# Altium PCB Expansion_Board_LDO Ver_for_MSP430.PcbDoc (part 2 of 2)
Units mil, origin at the board's own origin, x right, y up, seen from the top; angles counter-clockwise.
Board outline 6000 x 4000 mil, 2 copper layers (Top Layer, Bottom Layer); 157 components, 146 nets, 583 pads, 420 vias.
Unrouted connection lines stored in the file: 1.
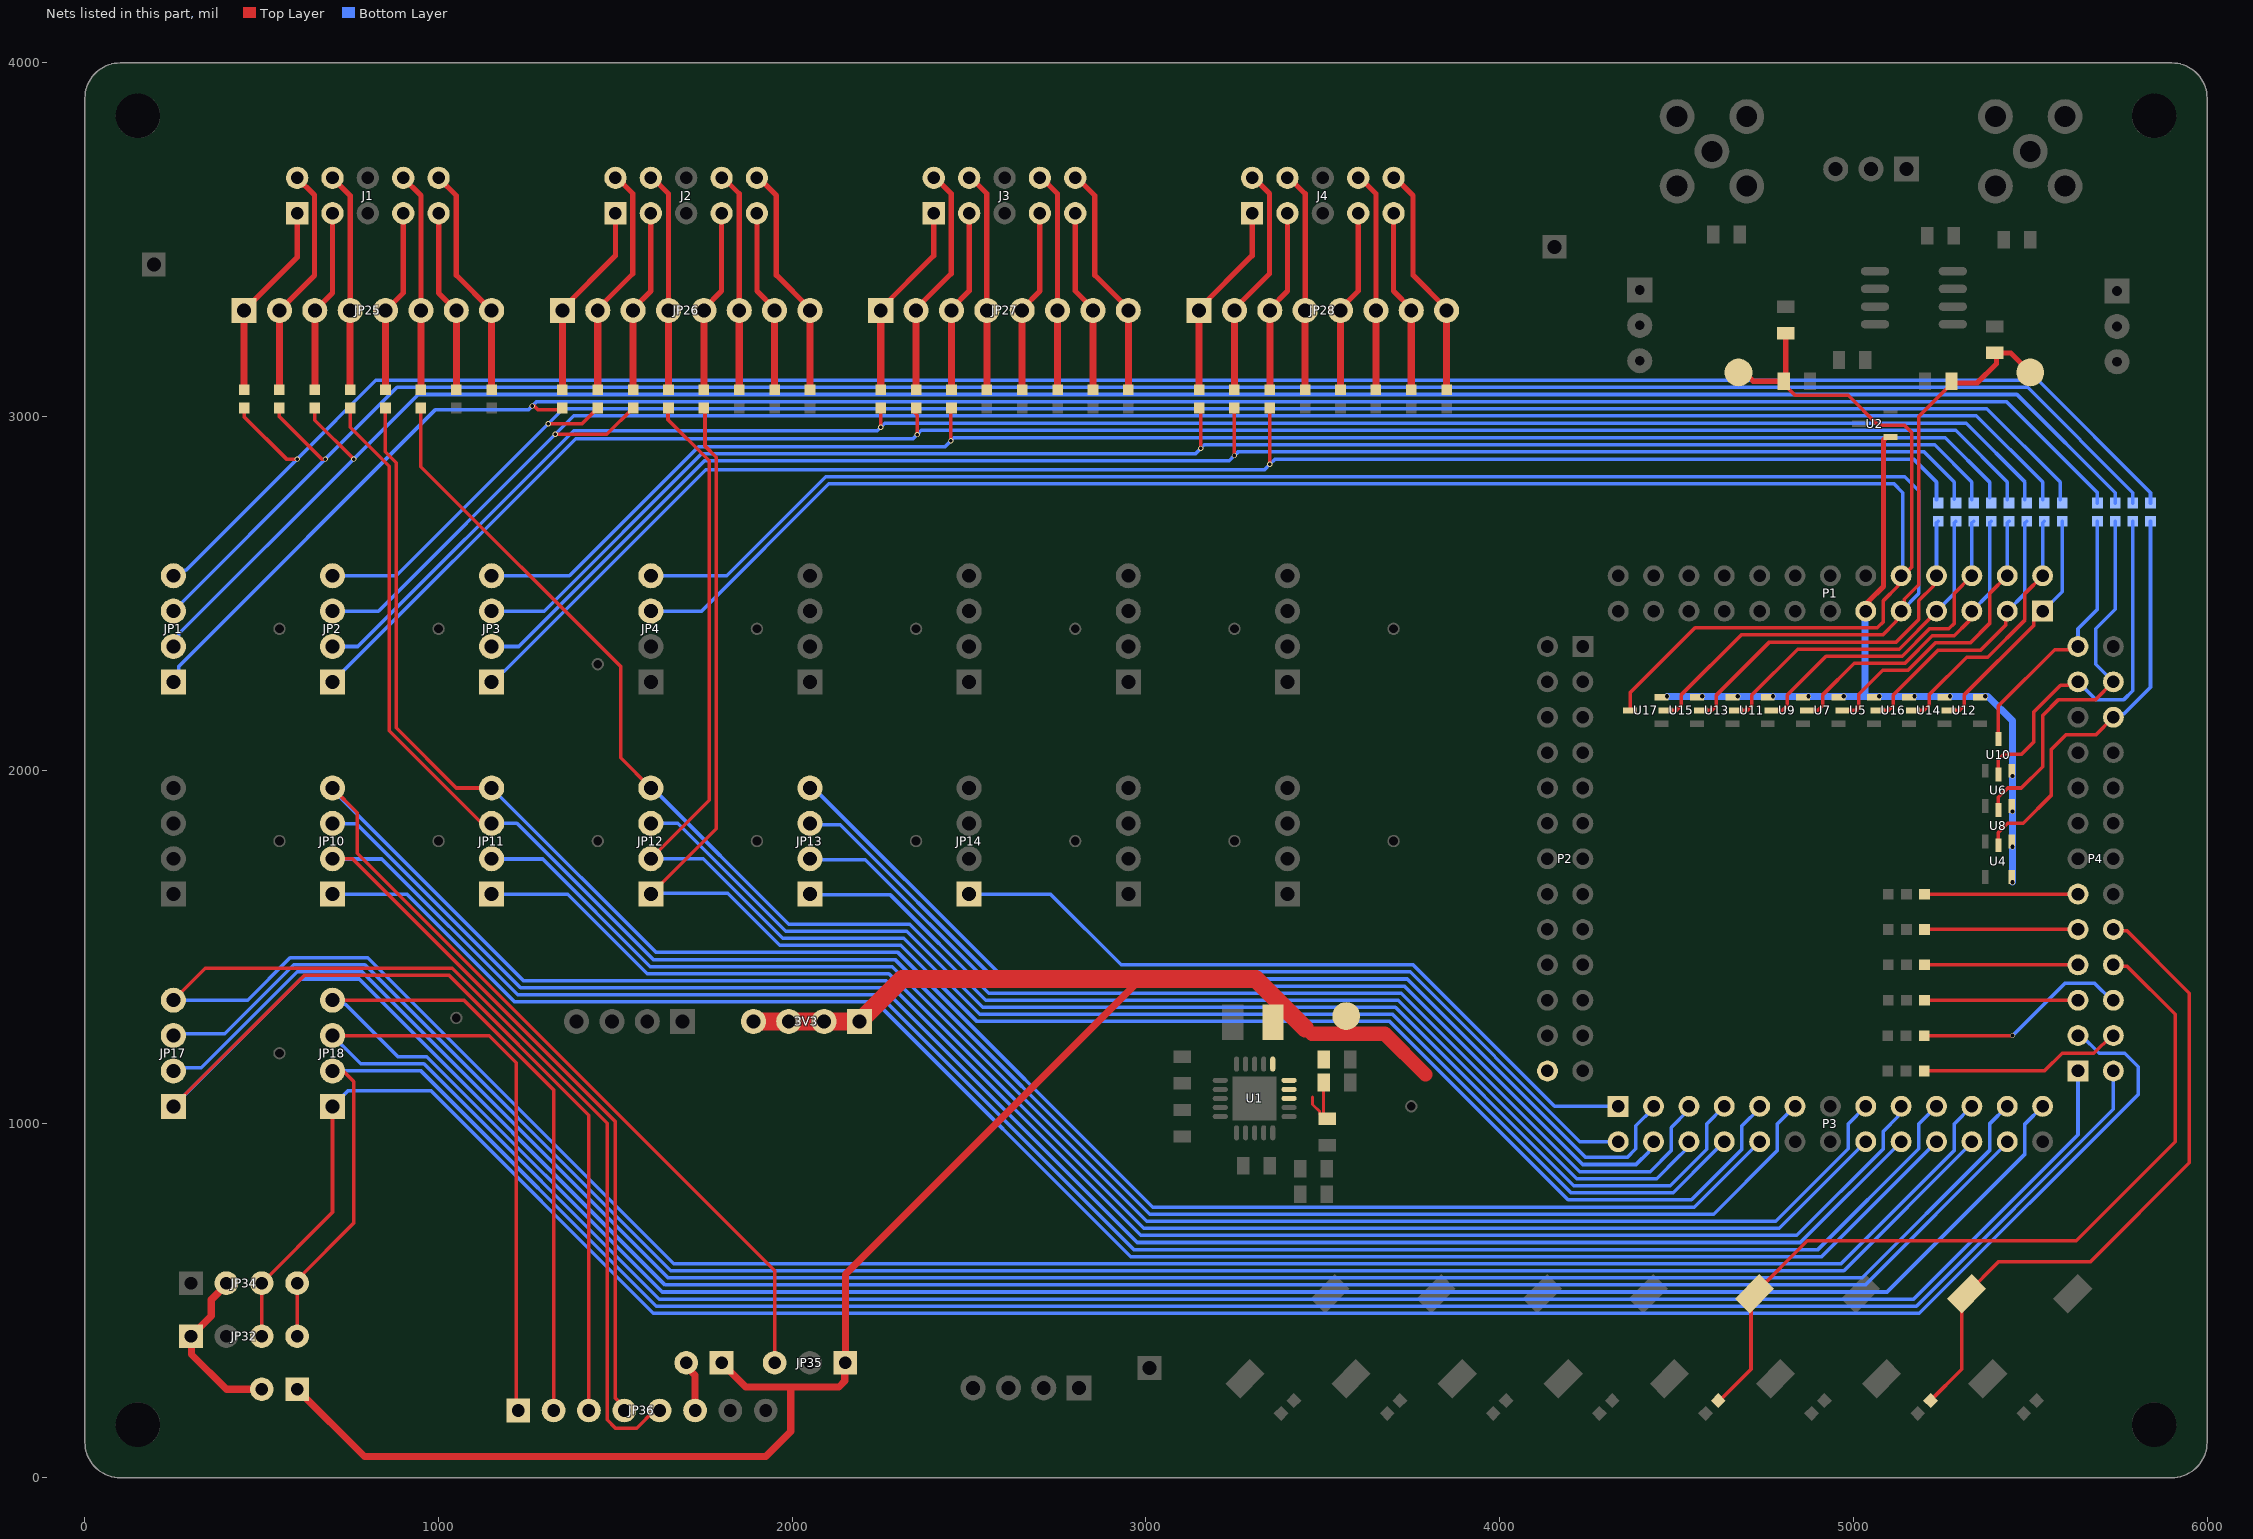
[diagram p2: the nets of this part, all layers, seen from the top]

## Via types
v1: diameter 15, hole 10, Top Layer to Bottom Layer, tented both sides, 265 vias
v2: diameter 15, hole 12, Top Layer to Bottom Layer, tented both sides, 155 vias

## Nets (pads, with @x,y where several pads share a name; then routed paths per layer and width w, separated by ;. In a path a pad name is that pad's centre, name@x,y a point inside that pad or via, vN(x,y) a via of type N, cw(c..) or ccw(c..) an arc to the next point about the centre after c; other vN are vias at no path point) (continued)
P5.0: 5.0.1 JP4.4 P1.9 R38.1 R39.2 U15.3 | length 5895.8
  Top Layer w10: U15.3@4468.48,2169.14 4498.99,2169.14 4512.77,2182.92 4512.77,2212.77 4682.65,2382.65 5082.65,2382.65 5121.01,2421.01 5121.01,2422.74 5135,2436.73 P1.9@5135,2450 5143.99,2458.99 5143.99,2483.99 5185,2525 5185,3000.1 R39.2@5277.4,3092.5
  Top Layer w15: R39.2@5277.4,3100 5282.4,3095 5350,3095 5404.51,3149.51 5404.51,3175.49 R38.1@5400,3180 5445,3180 5.0.1@5500,3125
  Bottom Layer w10: JP4.4@1600,2550 1815,2550 2095,2830 5145,2830 5185,2790 5185,2500 P1.9@5135,2450
P5.1: 5.1.1 JP4.3 P1.10 R34.1 R35.2 U17.3 | length 6060.8
  Top Layer w10: U17.3@4368.48,2169.14 4368.48,2218.81 4552.31,2402.65 5067.65,2402.65 5085,2420 5085,2480 5125.61,2520.61 5125.61,2540.61 P1.10@5135,2550 5140.31,2550 5165,2574.69 5165,2955 5145,2975 5070.47,2975 4985.46,3060 4835.1,3060 4815.1,3080 4802.6,3092.5 R35.2@4802.6,3100 R35.2@4809.07,3106.47
  Top Layer w15: 5.1.1@4675,3125 4692.25,3125 4717.24,3100 R35.2@4802.6,3100 ; R35.2@4809.07,3106.47 R34.1@4809.07,3235.97
  Bottom Layer w10: JP4.3@1600,2450 1743.28,2450 2103.28,2810 5115,2810 5140,2785 5140,2555 P1.10@5135,2550
P5.4: JP14.1 P3.1 | length 2083.5
  Bottom Layer w10: JP14.1@2500,1650 2730,1650 2930,1450 3755,1450 4155,1050 P3.1@4335,1050
P5.5: JP13.4 P3.2 | length 2699.2
  Bottom Layer w10: JP13.4@2050,1950 2060,1950 2580,1430 3746.72,1430 4226.72,950 P3.2@4335,950
P5.6: JP13.3 P3.3 | length 2877.1
  Bottom Layer w10: JP13.3@2050,1850 2054.27,1845.73 2135.99,1845.73 2571.72,1410 3738.43,1410 4242.96,905.47 4360.47,905.47 4385,930 4385,995 4435,1045 P3.3@4435,1050
P5.7: JP13.2 P3.4 | length 2778.6
  Bottom Layer w10: JP13.2@2050,1750 2053.28,1746.72 2206.72,1746.72 2563.43,1390 3730.15,1390 4234.68,885.47 4385.47,885.47 4421.01,921.01 4421.01,922.74 4435,936.73 P3.4@4435,950
P6.0: JP1.4 R1.1 R49.2 | length 6204.4
  Top Layer w10: R1.1@450,3024.41 450,3000 570,2880 v1(600.47,2880)
  Bottom Layer w10: JP1.4@250,2550 266.47,2550 282.13,2565.66 285.66,2565.66 600.23,2880.23 822.5,3102.5 5522.5,3102.5 5840,2785 R49.2@5840,2755.59
P6.0-: P4.22 R49.1 U4.3 | length 1181.8
  Top Layer w10: U4.3@5410,1788.07 5410,1824.09 5435.91,1850 5480,1850 5560,1930 5560,2060 5600,2100 5685,2100 P4.22@5735,2150
  Bottom Layer w10: P4.22@5735,2150 5744.39,2159.39 5764.39,2159.39 5840,2235 R49.1@5840,2704.41
P6.1: JP1.3 R5.1 R50.2 | length 6158.7
  Top Layer w10: R5.1@550,3024.41 550,3000 670,2880 v1(680,2880)
  Bottom Layer w10: JP1.3@250,2450 v1(680,2880) 882.5,3082.5 5492.5,3082.5 5790,2785 R50.2@5790,2755.59
P6.1-: P4.23 R50.1 U6.3 | length 1073.3
  Top Layer w10: U6.3@5410,1988.07 5410,2030 5424.87,2044.87 5474.87,2044.87 5510,2080 5510,2165 5585.61,2240.61 5625.61,2240.61 P4.23@5635,2250
  Bottom Layer w10: P4.23@5635,2250 5685,2200 5765,2200 5790,2225 R50.1@5790,2704.41
P6.2: JP1.2 R9.1 R51.2 | length 6131.2
  Top Layer w10: R9.1@650,3024.41 650,2990 v1(760,2880)
  Bottom Layer w10: JP1.2@250,2350 250,2366.47 265.66,2382.13 265.66,2385.66 v1(760,2880) 942.5,3062.5 5462.5,3062.5 5740,2785 R51.2@5740,2755.59
P6.2-: P4.24 R51.1 U8.3 | length 1078.9
  Top Layer w10: U8.3@5410,1888.07 5410,1924.09 5435.91,1950 5475,1950 5535,2010 5535,2155 5580,2200 5685,2200 P4.24@5735,2250
  Bottom Layer w10: P4.24@5735,2250 5685,2300 5685,2400 5740,2455 R51.1@5740,2704.41
P6.3: JP1.1 R2.1 R52.2 | length 6012.1
  Top Layer w10: v1(1265,3030) 1270,3030 1280,3020 1345.6,3020 R2.1@1350,3024.41
  Bottom Layer w10: JP1.1@250,2250 265.9,2265.9 265.9,2294.58 991.32,3020 1255,3020 v1(1265,3030) 1277.5,3042.5 5432.5,3042.5 5690,2785 R52.2@5690,2755.59
P6.3-: P4.25 R52.1 U10.3 | length 765.5
  Top Layer w10: U10.3@5410,2088.07 5410,2181.72 5568.9,2340.61 5625.61,2340.61 P4.25@5635,2350
  Bottom Layer w10: P4.25@5635,2350 5635,2400 5690,2455 R52.1@5690,2704.41
P6.4: JP2.4 R6.1 R41.1 | length 5375.1
  Top Layer w10: v1(1310,2980) 1405.6,2980 R6.1@1450,3024.41
  Bottom Layer w10: JP2.4@700,2550 880,2550 v1(1310,2980) 1352.5,3022.5 5377.5,3022.5 5585,2815 R41.1@5585,2765
P6.4-: P1.1 R41.2 U12.3 | length 686.3
  Top Layer w10: U12.3@5268.48,2169.14 5298.99,2169.14 5312.77,2182.92 5312.77,2212.77 5510.47,2410.47 5510.47,2425.47 P1.1@5535,2450
  Bottom Layer w10: P1.1@5535,2450 5590,2505 R41.2@5590,2704.41
P6.5: JP2.3 R10.1 R42.2 | length 5442.3
  Top Layer w10: v1(1330,2950) 1475.6,2950 R10.1@1550,3024.41
  Bottom Layer w10: JP2.3@700,2450 830,2450 v1(1330,2950) 1382.5,3002.5 5347.5,3002.5 5535,2815 R42.2@5535,2765
P6.5-: P1.2 R42.1 U14.3 | length 742.2
  Top Layer w10: U14.3@5168.48,2169.14 5198.99,2169.14 5215,2185.15 5215,2215 5320,2320 5380,2320 5485,2425 5485,2500 P1.2@5535,2550
  Bottom Layer w10: P1.2@5535,2550 5535,2699.41 R42.1@5540,2704.41
P6.6: JP2.2 R3.1 R43.1 | length 5219.5
  Top Layer w10: v1(2250,2970) R3.1@2250,3024.41
  Bottom Layer w10: JP2.2@700,2350 771.72,2350 1381.72,2960 2240,2960 v1(2250,2970) 2260.96,2980.96 5319.04,2980.96 5485,2815 R43.1@5485,2765
P6.6-: P1.3 R43.2 U16.3 | length 798
  Top Layer w10: U16.3@5068.48,2169.14 5098.99,2169.14 5112.77,2182.92 5112.77,2212.77 5160,2260 5240,2340 5360,2340 5431.33,2411.33 5431.33,2446.33 P1.3@5435,2450
  Bottom Layer w10: P1.3@5435,2450 5485,2500 5485,2699.41 R43.2@5490,2704.41
P6.7: JP2.1 R7.1 R44.2 | length 5223.6
  Top Layer w10: R7.1@2350,3024.41 2341.25,3015.66 2352.98,3003.93 v1(2352.98,2949.23)
  Bottom Layer w10: JP2.1@700,2250 1387.5,2937.5 2341.25,2937.5 v1(2352.98,2949.23) 2364.71,2960.96 5289.04,2960.96 5435,2815 R44.2@5435,2765
P6.7-: P1.4 R44.1 U5.3 | length 854
  Top Layer w10: U5.3@4968.48,2169.14 5009.14,2169.14 5015,2175 5015,2215 5082.65,2282.65 5154.36,2282.65 5231.72,2360 5330,2360 5385,2415 5385,2500 P1.4@5435,2550
  Bottom Layer w10: P1.4@5435,2550 5435,2699.41 R44.1@5440,2704.41
P7.2: JP13.1 P3.5 | length 2930.3
  Bottom Layer w10: JP13.1@2050,1650 2052.43,1647.57 2277.57,1647.57 2555.15,1370 3721.86,1370 4226.39,865.47 4425.47,865.47 4485,925 4485,990 4535,1040 P3.5@4535,1050
P7.3: JP12.4 P3.6 R21.1 | length 4787.2
  Top Layer w10: R21.1@950,3024.41 950,2858.43 1515,2293.43 1515,2035 JP12.4@1600,1950
  Bottom Layer w10: JP12.4@1600,1950 1604.85,1950 1989.85,1565 2331.86,1565 2546.86,1350 3713.58,1350 4218.11,845.47 4443.76,845.47 4505,906.72 4520.16,921.87 ; 4520.16,921.88 4535,936.73 P3.6@4535,950
P7.4: JP3.4 R11.1 R45.1 | length 4588.6
  Top Layer w10: v1(2448.58,2931.65) 2448.58,3018.36 2452.31,3022.09 R11.1@2450,3024.41
  Bottom Layer w10: JP3.4@1150,2550 1370,2550 1735,2915 2431.93,2915 v1(2448.58,2931.65) 2456.93,2940 5260,2940 5385,2815 R45.1@5385,2770
P7.4-: P1.5 R45.2 U7.3 | length 889.3
  Top Layer w10: U7.3@4868.48,2169.14 4898.99,2169.14 4912.77,2182.92 4912.77,2212.77 5002.65,2302.65 5146.08,2302.65 5223.43,2380 5285,2380 5325.61,2420.61 5325.61,2440.61 P1.5@5335,2450
  Bottom Layer w10: P1.5@5335,2450 5385,2500 5385,2699.41 R45.2@5390,2704.41
P7.5: JP3.3 R4.1 R46.2 | length 4589.6
  Top Layer w10: R4.1@3150,3024.41 3155,3019.41 v1(3155,2910)
  Bottom Layer w10: JP3.3@1150,2450 1298.28,2450 1743.28,2895 3140,2895 v1(3155,2910) 3165,2920 5230,2920 5335,2815 R46.2@5335,2765
P7.5-: P1.6 R46.1 U9.3 | length 948
  Top Layer w10: U9.3@4768.48,2169.14 4798.99,2169.14 4812.77,2182.92 4812.77,2212.77 4922.65,2322.65 5137.79,2322.65 5215.15,2400 5270,2400 5285,2415 5285,2500 P1.6@5335,2550
  Bottom Layer w10: P1.6@5335,2550 5335,2699.41 R46.1@5340,2704.41
P7.6: JP3.2 R8.1 R47.1 | length 4591.2
  Top Layer w10: 3250,2900 v1(3250,2890) R8.1@3250,3024.41
  Bottom Layer w10: JP3.2@1150,2350 1226.57,2350 1751.57,2875 3235,2875 v1(3250,2890) 3260,2900 5200,2900 5285,2815 R47.1@5285,2766.26
P7.6-: P1.7 R47.2 U11.3 | length 978.6
  Top Layer w10: U11.3@4668.48,2169.14 4698.99,2169.14 4712.77,2182.92 4712.77,2212.77 4842.65,2342.65 5129.51,2342.65 5235,2448.14 P1.7@5235,2450
  Bottom Layer w10: P1.7@5235,2450 5285,2500 5285,2699.41 R47.2@5290,2704.41
P7.7: JP3.1 R12.1 R48.2 | length 4582.3
  Top Layer w10: v1(3350,2865) R12.1@3350,3024.41
  Bottom Layer w10: JP3.1@1150,2250 1180.43,2280.43 1185.43,2280.43 1755,2850 3335,2850 v1(3350,2865) 3365,2880 5170,2880 5235,2815 R48.2@5235,2765
P7.7-: P1.8 R48.1 U13.3 | length 1041.3
  Top Layer w10: U13.3@4568.48,2169.14 4598.99,2169.14 4612.77,2182.92 4612.77,2212.77 4762.65,2362.65 5121.22,2362.65 5185,2426.42 5185,2480 5225.61,2520.61 5225.61,2540.61 P1.8@5235,2550
  Bottom Layer w10: P1.8@5235,2550 5235,2699.41 R48.1@5240,2704.41
P8.0: JP12.3 P3.7 | length 3594.4
  Bottom Layer w10: JP12.3@1600,1850 1676.57,1850 1981.57,1545 2323.58,1545 2538.58,1330 3705.3,1330 4209.82,825.47 4482.19,825.47 4585,928.28 4585,1000 P3.7@4635,1050
P8.1: JP12.2 P3.8 R14.1 | length 4877.7
  Top Layer w10: JP12.2@1600,1750 1765,1915 1765,2875 1648.56,2991.44 1648.56,3022.96 R14.1@1650,3024.41
  Bottom Layer w10: JP12.2@1600,1750 1748.28,1750 1973.28,1525 2315.29,1525 2530.29,1310 3697.01,1310 4201.54,805.47 4490.47,805.47 4600,915 P3.8@4635,950
P8.2: JP12.1 P3.9 R18.1 | length 5112.3
  Top Layer w10: JP12.1@1600,1650 1785,1835 1785,2885 1753.21,2916.79 1753.21,3021.2 R18.1@1750,3024.41
  Bottom Layer w10: JP12.1@1600,1650 1602.57,1652.57 1817.43,1652.57 1965,1505 2307.01,1505 2522.01,1290 3688.73,1290 4193.25,785.47 4542.19,785.47 4685,928.28 4685,995 4735,1045 P3.9@4735,1050
P8.3: JP11.4 P3.10 R17.1 | length 5410.3
  Top Layer w10: R17.1@850,3024.41 849.26,3023.66 849.26,2900.74 880,2870 880,2120 1050,1950 JP11.4@1150,1950
  Bottom Layer w10: JP11.4@1150,1950 1188.52,1911.48 1615,1485 2298.73,1485 3018.73,765 4550,765 P3.10@4735,950
P8.4: JP11.3 P3.11 R13.1 | length 5669.8
  Top Layer w10: R13.1@750,3024.41 750,2970 860,2860 860,2111.72 1121.72,1850 JP11.3@1150,1850
  Bottom Layer w10: JP11.3@1150,1850 1150.22,1850.22 1221.5,1850.22 1606.72,1465 2290.44,1465 3010.44,745 4605,745 4785,925 4785,1000 P3.11@4835,1050
P8.5: JP11.2 P3.15 | length 4485.2
  Bottom Layer w10: JP11.2@1150,1750 1150.78,1749.22 1294.22,1749.22 1598.43,1445 2282.16,1445 3002.16,725 4780,725 4985,930 4985,1000 P3.15@5035,1050
P8.6: JP11.1 P3.16 | length 4377.9
  Bottom Layer w10: JP11.1@1150,1650 1365,1650 1590,1425 2273.28,1425 2993.28,705 4790,705 P3.16@5035,950
P8.7: JP10.4 JP35.3 P3.17 | length 7296.9
  Top Layer w10: JP10.4@700,1950 770,1880 770,1765 1950,585 JP35.3@1950,325
  Bottom Layer w10: JP10.4@700,1950 700,1945 1240,1405 2265,1405 2985,685 4840,685 5085,930 5085,980 5125.61,1020.61 5125.61,1040.61 P3.17@5135,1050
P9.0: JP10.3 P3.18 | length 5043.9
  Bottom Layer w10: JP10.3@700,1850 701.64,1848.36 768.36,1848.36 1231.72,1385 2255,1385 2975,665 4850,665 P3.18@5135,950
P9.1: JP10.2 JP36.4 P3.19 | length 7136.4
  Top Layer w10: JP10.2@700,1750 756.72,1750 1500,1006.72 1500,224.32 1525,199.32 JP36.4@1525,190
  Bottom Layer w10: JP10.2@700,1750 700.78,1749.22 839.22,1749.22 1223.43,1365 2245,1365 2965,645 4900,645 5185,930 5185,1000 P3.19@5235,1050
P9.2: JP10.1 P3.20 | length 5094.2
  Bottom Layer w10: JP10.1@700,1650 700.07,1650.07 910.07,1650.07 1215.15,1345 2236.72,1345 2956.72,625 4910,625 P3.20@5235,950
P9.3: JP17.4 JP36.5 P3.21 | length 8183.9
  Top Layer w10: JP17.4@250,1350 340,1440 1038.43,1440 1476.54,1001.9 1476.54,163.46 1500,140 1560,140 1610,190 JP36.5@1625,190
  Bottom Layer w10: JP17.4@250,1350 460,1350 580,1470 800,1470 1665,605 4965,605 5285,925 5285,1000 P3.21@5335,1050
P9.4: JP17.3 P3.22 | length 5679.2
  Bottom Layer w10: JP17.3@250,1250 255,1255 395,1255 590,1450 791.72,1450 1656.72,585 4973.28,585 5335,946.72 P3.22@5335,950
P9.5: JP17.2 P3.23 | length 5904.1
  Bottom Layer w10: JP17.2@250,1150 259.02,1159.02 329.02,1159.02 475,1305 600,1430 783.43,1430 1648.43,565 5025,565 5385,925 5385,1000 P3.23@5435,1050
P9.6: JP17.1 JP36.3 P3.24 | length 8189.1
  Top Layer w10: JP17.1@250,1050 620,1420 1030.15,1420 1425,1025.15 JP36.3@1425,190
  Bottom Layer w10: JP17.1@250,1050 280.43,1080.43 480,1280 610,1410 775.15,1410 1640.15,545 5033.28,545 5435,946.72 P3.24@5435,950
P9.7: JP18.4 JP36.2 P3.25 | length 7080.7
  Top Layer w10: JP18.4@700,1350 1071.86,1350 1325,1096.86 JP36.2@1325,190
  Bottom Layer w10: JP18.4@700,1350 711.65,1338.35 736.65,1338.35 885,1190 966.86,1190 1631.86,525 5095,525 5485,915 5485,1000 P3.25@5535,1050
P10.0: JP18.3 JP36.1 P4.1 | length 7153.5
  Top Layer w10: JP18.3@700,1250 1143.58,1250 1220,1173.58 1220,195 JP36.1@1225,190
  Bottom Layer w10: JP18.3@700,1250 780,1170 958.58,1170 1623.58,505 5170,505 5635,970 P4.1@5635,1150
P10.1: JP18.2 JP32.4 JP34.4 P4.2 | length 6508
  Top Layer w10: JP32.4@600,400 600,560 760,720 760,1120 730,1150 JP18.2@700,1150
  Bottom Layer w10: JP18.2@700,1150 950.29,1150 1615.29,485 5178.28,485 5735,1041.72 P4.2@5735,1150
P10.2: JP18.1 JP32.3 JP34.3 P4.3 | length 6658.1
  Top Layer w10: JP32.3@500,400 JP34.3@500,550 700,750 JP18.1@700,1050
  Bottom Layer w10: JP18.1@700,1050 744.58,1094.58 977.44,1094.58 1607.01,465 5186.57,465 5805,1083.43 5805,1161.72 5766.72,1200 5695,1200 5645,1250 P4.3@5635,1250
P10.3: P4.4 R63.2 | length 581.6
  Top Layer w10: R63.2@5200,1150 5540,1150 5590,1200 5680,1200 5730,1250 P4.4@5735,1250 P4.4@5738.67,1246.33
P10.4: P4.5 R59.2 | length 433.8
  Top Layer w10: R59.2@5201.18,1350 P4.5@5635,1350
P10.5: P4.6 R61.2 | length 621.5
  Top Layer w10: R61.2@5200,1250 v2(5450,1250) ; P4.6@5735,1350 P4.6@5738.67,1346.33
  Bottom Layer w10: v2(5450,1250) 5598.19,1398.19 5681.81,1398.19 5730,1350 P4.6@5735,1350
P10.6: P4.7 R55.2 | length 433.8
  Top Layer w10: R55.2@5200,1450 P4.7@5633.82,1450
P10.7: C16.1 P4.8 SW5.1 | length 2285.5
  Top Layer w10: C16.1@4622.33,218.1 4710.52,306.29 SW5.1@4710.52,506.29 ; SW5.1@4720.21,520.21 4870,670 5630,670 5910,950 5910,1310 5773.67,1446.33 5738.67,1446.33 P4.8@5735,1450
P11.0: P4.9 R57.2 | length 433.8
  Top Layer w10: R57.2@5201.18,1550 P4.9@5635,1550
P11.1: C8.1 P4.10 SW7.1 | length 1877.2
  Top Layer w10: C8.1@5218.1,218.1 5306.29,306.29 SW7.1@5306.29,506.29 ; SW7.1@5320.21,520.21 5410,610 5670,610 5950,890 5950,1370 5773.67,1546.33 5738.67,1546.33 P4.10@5735,1550
P11.2: P4.11 R53.2 | length 438.8
  Top Layer w10: R53.2@5201.18,1650 P4.11@5635,1650 P4.11@5640,1650
UD1.1: J1.1 JP25.1 R1.2 | length 561.5
  Top Layer w15: JP25.1@450,3300 600,3450 J1.1@600,3575
  Top Layer w20: R1.2@450,3075.59 JP25.1@450,3300
UD1.2: J1.2 JP25.2 R5.2 | length 660.7
  Top Layer w15: JP25.2@550,3300 649,3399 649,3626 J1.2@600,3675
  Top Layer w20: R5.2@550,3075.59 JP25.2@550,3300
UD1.3: J1.3 JP25.3 R9.2 | length 520.1
  Top Layer w15: JP25.3@650,3300 700,3350 J1.3@700,3575
  Top Layer w20: R9.2@650,3075.59 JP25.3@650,3300
UD1.4: J1.4 JP25.4 R13.2 | length 620.1
  Top Layer w15: J1.4@700,3675 750,3625 JP25.4@750,3300
  Top Layer w20: R13.2@750,3075.59 JP25.4@750,3300
UD1.5: J1.7 JP25.5 R17.2 | length 520.1
  Top Layer w15: JP25.5@850,3300 900,3350 J1.7@900,3575
  Top Layer w20: R17.2@850,3075.59 JP25.5@850,3300
UD1.6: J1.8 JP25.6 R21.2 | length 620.1
  Top Layer w15: J1.8@900,3675 950,3625 JP25.6@950,3300
  Top Layer w20: R21.2@950,3075.59 JP25.6@950,3300
UD1.7: J1.9 JP25.7 R25.2 | length 520.1
  Top Layer w15: J1.9@1000,3575 1000,3350 JP25.7@1050,3300
  Top Layer w20: R25.2@1050,3075.59 JP25.7@1050,3300
UD1.8: J1.10 JP25.8 R29.2 | length 661.5
  Top Layer w15: J1.10@1000,3675 1050,3625 1050,3400 JP25.8@1150,3300
  Top Layer w20: R29.2@1150,3075.59 JP25.8@1150,3300
UD2.1: J2.1 JP26.1 R2.2 | length 561.5
  Top Layer w15: JP26.1@1350,3305 1500,3455 J2.1@1500,3580
  Top Layer w20: R2.2@1350,3080.59 JP26.1@1350,3305
UD2.2: J2.2 JP26.2 R6.2 | length 660.7
  Top Layer w15: JP26.2@1450,3305 1549,3404 1549,3631 J2.2@1500,3680
  Top Layer w20: R6.2@1450,3080.59 JP26.2@1450,3305
UD2.3: J2.3 JP26.3 R10.2 | length 520.1
  Top Layer w15: JP26.3@1550,3305 1600,3355 J2.3@1600,3580
  Top Layer w20: R10.2@1550,3080.59 JP26.3@1550,3305
UD2.4: J2.4 JP26.4 R14.2 | length 620.1
  Top Layer w15: J2.4@1600,3680 1650,3630 JP26.4@1650,3305
  Top Layer w20: R14.2@1650,3080.59 JP26.4@1650,3305
UD2.5: J2.7 JP26.5 R18.2 | length 520.1
  Top Layer w15: JP26.5@1750,3305 1800,3355 J2.7@1800,3580
  Top Layer w20: R18.2@1750,3080.59 JP26.5@1750,3305
UD2.6: J2.8 JP26.6 R22.2 | length 620.1
  Top Layer w15: J2.8@1800,3680 1850,3630 JP26.6@1850,3305
  Top Layer w20: R22.2@1850,3080.59 JP26.6@1850,3305
UD2.7: J2.9 JP26.7 R26.2 | length 520.1
  Top Layer w15: J2.9@1900,3580 1900,3355 JP26.7@1950,3305
  Top Layer w20: R26.2@1950,3080.59 JP26.7@1950,3305
UD2.8: J2.10 JP26.8 R30.2 | length 661.5
  Top Layer w15: J2.10@1900,3680 1955,3625 1955,3400 JP26.8@2050,3305
  Top Layer w20: R30.2@2050,3080.59 JP26.8@2050,3305
UD3.1: J3.1 JP27.1 R3.2 | length 561.5
  Top Layer w15: JP27.1@2250,3305 2400,3455 J3.1@2400,3580
  Top Layer w20: R3.2@2250,3080.59 JP27.1@2250,3305
UD3.2: J3.2 JP27.2 R7.2 | length 660.7
  Top Layer w15: JP27.2@2350,3305 2449,3404 2449,3631 J3.2@2400,3680
  Top Layer w20: R7.2@2350,3080.59 JP27.2@2350,3305
UD3.3: J3.3 JP27.3 R11.2 | length 520.1
  Top Layer w15: JP27.3@2450,3305 2500,3355 J3.3@2500,3580
  Top Layer w20: R11.2@2450,3080.59 JP27.3@2450,3305
UD3.4: J3.4 JP27.4 R15.2 | length 620.1
  Top Layer w15: J3.4@2500,3680 2550,3630 JP27.4@2550,3305
  Top Layer w20: R15.2@2550,3080.59 JP27.4@2550,3305
UD3.5: J3.7 JP27.5 R19.2 | length 520.1
  Top Layer w15: JP27.5@2650,3305 2700,3355 J3.7@2700,3580
  Top Layer w20: R19.2@2650,3080.59 JP27.5@2650,3305
UD3.6: J3.8 JP27.6 R23.2 | length 620.1
  Top Layer w15: J3.8@2700,3680 2750,3630 JP27.6@2750,3305
  Top Layer w20: R23.2@2750,3080.59 JP27.6@2750,3305
UD3.7: J3.9 JP27.7 R27.2 | length 520.1
  Top Layer w15: J3.9@2800,3580 2800,3355 JP27.7@2850,3305
  Top Layer w20: R27.2@2850,3080.59 JP27.7@2850,3305
UD3.8: J3.10 JP27.8 R31.2 | length 661.5
  Top Layer w15: J3.10@2800,3680 2855,3625 2855,3400 JP27.8@2950,3305
  Top Layer w20: R31.2@2950,3080.59 JP27.8@2950,3305
UD4.1: J4.1 JP28.1 R4.2 | length 561.5
  Top Layer w15: JP28.1@3150,3305 3300,3455 J4.1@3300,3580
  Top Layer w20: R4.2@3150,3080.59 JP28.1@3150,3305
UD4.2: J4.2 JP28.2 R8.2 | length 660.7
  Top Layer w15: JP28.2@3250,3305 3349,3404 3349,3631 J4.2@3300,3680
  Top Layer w20: R8.2@3250,3080.59 JP28.2@3250,3305
UD4.3: J4.3 JP28.3 R12.2 | length 520.1
  Top Layer w15: JP28.3@3350,3305 3400,3355 J4.3@3400,3580
  Top Layer w20: R12.2@3350,3080.59 JP28.3@3350,3305
UD4.4: J4.4 JP28.4 R16.2 | length 620.1
  Top Layer w15: J4.4@3400,3680 3450,3630 JP28.4@3450,3305
  Top Layer w20: R16.2@3450,3080.59 JP28.4@3450,3305
UD4.5: J4.7 JP28.5 R20.2 | length 520.1
  Top Layer w15: JP28.5@3550,3305 3600,3355 J4.7@3600,3580
  Top Layer w20: R20.2@3550,3080.59 JP28.5@3550,3305
UD4.6: J4.8 JP28.6 R24.2 | length 620.1
  Top Layer w15: J4.8@3600,3680 3650,3630 JP28.6@3650,3305
  Top Layer w20: R24.2@3650,3080.59 JP28.6@3650,3305
UD4.7: J4.9 JP28.7 R28.2 | length 520.1
  Top Layer w15: J4.9@3700,3580 3700,3355 JP28.7@3750,3305
  Top Layer w20: R28.2@3750,3080.59 JP28.7@3750,3305
UD4.8: J4.10 JP28.8 R32.2 | length 661.5
  Top Layer w15: J4.10@3700,3680 3755,3625 3755,3400 JP28.8@3850,3305
  Top Layer w20: R32.2@3850,3080.59 JP28.8@3850,3305
VCC: 3V3.1 3V3.2 3V3.3 3V3.4 C5.1 C6.2 C7.2 JP35.1 JP37.1 JP38.1 P1.11 P2.26 R33.2 U1.1 U1.18 U1.19 U1.20 U2.1 U4.2 U5.2 U6.2 U7.2 U8.2 U9.2 U10.2 U11.2 U12.2 U13.2 U14.2 U15.2 U16.2 U17.2 | length 7960.6
  Top Layer w8: 3471.2,1076.2 3471.2,1055.61 3491.21,1035.6 3491.21,1028.1 3494.7,1024.61 3502.2,1024.61 C7.2@3502.2,1117.2 ; R33.2@3512.21,1014.6 3519.71,1014.6 R33.2@3533.21,1001.1
  Top Layer w15: P1.11@5035,2450 5043.43,2458.43 5043.43,2478.43 5085,2520 5085,2933.43 5094.17,2942.6 U2.1@5105,2942.6
  Top Layer w20: JP38.1@600,250 790,60 1925,60 1995.63,130.63 1995.63,256.54 ; JP37.1@1800,325 1868.46,256.54 1995.63,256.54 ; 2985,1410 2150,575 JP35.1@2150,325 2148.25,323.25 2148.25,273.25 2131.54,256.54 2002.85,256.54 1995.63,256.54
  Top Layer w40: 3469.39,1255 3675,1255 3790,1140
  Top Layer w50: 3V3.4@1890,1290 3V3.3@1990,1290 3V3.2@2090,1290 3V3.1@2190,1290 2310,1410 2985,1410 3310,1410 3450,1270
  Bottom Layer w20: v2(4472.77,2209.14) v2(4572.77,2209.14) v2(4672.77,2209.14) v2(4772.77,2209.14) v2(4872.77,2209.14) v2(4972.77,2209.14) 5021.06,2209.14 ; P1.11@5030,2445 P1.11@5035,2450 ; P1.11@5032.77,2447.5 5032.77,2220.86 5021.06,2209.14 ; v2(5450,1683.78) v2(5450,1783.78) v2(5450,1883.78) v2(5450,1983.78) 5450,2140 5380.86,2209.14 v2(5272.77,2209.14) v2(5172.77,2209.14) v2(5072.77,2209.14) 5021.06,2209.14
  other v2: 5372.77,2209.14
VCCLCD: JP36.6 JP37.2 | length 145.4
  Top Layer w20: JP37.2@1700,325 1700,314.82 1725,289.82 JP36.6@1725,190
VCCLED: JP32.1 JP34.2 JP38.2 | length 482.8
  Top Layer w20: JP34.2@400,550 400,545.76 357.24,503.01 357.24,457.24 JP32.1@300,400 301.75,398.25 301.75,348.25 400,250 JP38.2@500,250
pads on no net: JP6.1 P1.13 P1.14 P1.16 P2.13 P3.12 P3.14 P4.12 P4.14 P4.15 P4.16 P4.17 P4.18 P4.19 P4.20 P4.21 P4.26 U1.9
copper on no net: | length 5
  Bottom Layer w8: 4835,2545 4835,2550

## Polygon pours and split planes (outlines as drawn)
GND on Top Layer "NONET_L02_P-001" (solid, remove dead copper, pour order 9): 6890,-465 6840,-515 -560,-515 -560,5685 -110,6135 1190,4835 6690,4835
VCC on Top Layer "NONET_L02_P-001" (solid, remove dead copper, pour order 0): 3331.05,1368.17 3331.05,1238.17 3356.05,1213.17 3356.05,1158.17 3376.05,1158.17 3396.05,1138.17 3396.05,1069.99 3399.28,1066.17 3450.05,1066.17 3510.75,1015.57 3524.6,1015.92 3524.6,1250 3648.88,1250 3769.35,1117 4135,1121 4135,1179 3919.49,1202.77 3735,1368.17
+5 on Top Layer "NONET_L02_P-001" (solid, remove dead copper, pour order 1): 3052.25,1131.2 3151.7,1131.2 3220.7,1200.2 3256.7,1200.2 3264.7,1192.2 3264.7,1163.2 3243.7,1163.2 3212.7,1132.2 3212.7,1129.2 3212.7,1066.2 3189.7,1066.2 3174.7,1051.2 3174.7,1042.63 3191.02,1024.2 3214.7,1024.2 3214.7,1005.92 3234.36,988.2 3256.71,988.2 3256.71,950 3200.91,950 3129.7,1021.2 2995,1021.2 3026.2,1097.38
GND on Top Layer "NONET_L02_P-001" (solid, remove dead copper, pour order 4): 3275.69,975.02 3340,975.02 3340,955 3274.8,889.8 3274.8,854.8 3260,840 3210,840 3190,860 3190,915 3210,935 3265,935 3274.28,944.28
GND on Top Layer "NONET_L02_P-001" (solid, remove dead copper, pour order 10): -1000,2500
GND on Top Layer "NONET_L02_P-001" (solid, remove dead copper, pour order 8): -800,3500
no net on Top Layer "NONET_L02_P-001" (solid, remove dead copper, pour order 3): 3281.61,1010.82
no net on Top Layer "NONET_L02_P-001" (solid, remove dead copper, pour order 2): 3290,1025
GND on Bottom Layer "NONET_L02_P-001" (hatched Horizontal grid 20 track 20, remove dead copper, pour order 6): -16575,-340 21480,-340 21180,-40 21180,24830

## Keep-outs
Keep-Out Layer:
  the board outline again, w20

## Other copper
Top Layer:
  pour cut-out: 3535.06,1225 3559,1225 3559,1054 3541,1036 3529,1036 3529,1218.94
  pour cut-out: 3339,1194 3340.88,1192.12 3340.88,1180.12 3352.38,1168.62 3352.38,1148.98 3365.02,1148.98 3383.98,1130.02 3383.98,1027.03 3350,993.05 3350,964 3300.11,964 3236.87,1027.24 3236.87,1135.83 3264.7,1163.66 3264.7,1205.84 3270,1211.14
  pour cut-out: 3340,940 3330,930 3330,910 3282.98,910 3253.17,939.8 3262.03,948.66 3262.03,995.43 3291.56,995.43 3313.21,973.78
  pour cut-out: 3277.2,1350.21 3327.2,1350.21 3327.2,1197.2 3320,1190 3290,1190 3290,1191.14 3270,1211.14 3270,1300

## Silkscreen, mask and mechanical layers (free items; w line width, h text height)
Top Overlay:
  lines w10: 3150,80 3350,80 ; 3450,80 3650,80 ; 3450,100 3650,100 ; 3750,80 3950,80 ; 4050,80 4250,80 ; 4050,100 4250,100 ; 4650,80 4850,80 ; 4650,100 4850,100 ; 5250,80 5450,80 ; 5250,100 5450,100
  text "5.1in-GND-5.0in" at 4775,3875 h80
  text "1" at 1332.69,2920.37 h80
  text "2" at 1432.69,2920.37 h80
  text "3" at 1532.69,2920.37 h80
  text "4" at 1632.69,2920.37 h80
  text "7" at 1732.69,2920.37 h80
  text "8" at 1832.69,2920.37 h80
  text "9" at 1932.69,2920.37 h80
  text "10" at 2032.69,2920.37 h80
  text "1" at 2232.69,2920.37 h80
  text "2" at 2332.69,2920.37 h80
  text "3" at 2432.69,2920.37 h80
  text "4" at 2532.69,2920.37 h80
  text "7" at 2640,2920 h80
  text "8" at 2732.69,2920.37 h80
  text "9" at 2832.69,2920.37 h80
  text "10" at 2932.69,2920.37 h80
  text "1" at 3132.69,2920.37 h80
  text "2" at 3232.69,2920.37 h80
  text "3" at 3332.69,2920.37 h80
  text "4" at 3432.69,2920.37 h80
  text "7" at 3532.69,2920.37 h80
  text "8" at 3632.69,2920.37 h80
  text "9" at 3732.69,2920.37 h80
  text "10" at 3832.69,2920.37 h80
  text "1" at 425,2915 h80
  text "2" at 525,2915 h80
  text "3" at 625,2915 h80
  text "4" at 725,2915 h80
  text "7" at 825,2915 h80
  text "8" at 925,2915 h80
  text "9" at 1025,2915 h80
  text "10" at 1125,2915 h80
  text "4.2" at 2592.11,2762.8 h100 r90
  text "6.3" at 1380,2760 h100 r90
  text "6.4" at 1480,2760 h100 r90
  text "6.5" at 1580,2760 h100 r90
  text "8.1" at 1680,2760 h100 r90
  text "1.4" at 1880,2760 h100 r90
  text "1.3" at 1980,2760 h100 r90
  text "1.2" at 2100.3,2759.88 h100 r90
  text "6.6" at 2280,2760 h100 r90
  text "6.7" at 2390,2760 h100 r90
  text "7.4" at 2490,2760 h100 r90
  text "4.1" at 2680,2760 h100 r90
  text "3.0" at 2780,2760 h100 r90
  text "2.6" at 2880,2760 h100 r90
  text "2.5" at 3000,2760 h100 r90
  text "7.5" at 3180,2760 h100 r90
  text "7.6" at 3280,2760 h100 r90
  text "7.7" at 3390,2760 h100 r90
  text "4.3" at 3480,2760 h100 r90
  text "4.4" at 3580,2760 h100 r90
  text "2.1" at 3680,2760 h100 r90
  text "2.2" at 3790,2760 h100 r90
  text "2.3" at 3900,2760 h100 r90
  text "1.0" at 1190.93,2759.26 h100 r90
  text "6.2" at 672.3,2757.89 h100 r90
  text "1.1" at 1081.86,2758.33 h100 r90
  text "8.2" at 1772.63,2757.55 h100 r90
  text "6.0" at 472.93,2757.26 h100 r90
  text "6.1" at 572.93,2757.26 h100 r90
  text "8.4" at 773.26,2756.63 h100 r90
  text "8.3" at 873.26,2756.63 h100 r90
  text "7.3" at 972.48,2757.41 h100 r90
  text "6.0" at 425,2525 h80
  text "6.4" at 875,2525 h80
  text "7.4" at 1325,2525 h80
  text "5.0" at 1775,2525 h80
  text "1.2" at 2225,2525 h80
  text "1.6" at 2675,2525 h80
  text "2.5" at 3125,2525 h80
  text "2.1" at 3575,2525 h80
  text "6.1" at 425,2425 h80
  text "6.5" at 875,2425 h80
  text "7.5" at 1325,2425 h80
  text "5.1" at 1775,2425 h80
  text "1.3" at 2225,2425 h80
  text "1.7" at 2675,2425 h80
  text "2.6" at 3125,2425 h80
  text "2.2" at 3575,2425 h80
  text "6.2" at 425,2325 h80
  text "6.6" at 875,2325 h80
  text "7.6" at 1325,2325 h80
  text "1.0" at 1775,2325 h80
  text "1.4" at 2225,2325 h80
  text "2.0" at 2675,2325 h80
  text "2.7" at 3125,2325 h80
  text "2.3" at 3575,2325 h80
  text "6.3" at 425,2225 h80
  text "6.7" at 875,2225 h80
  text "7.7" at 1325,2225 h80
  text "1.1" at 1775,2225 h80
  text "1.5" at 2225,2225 h80
  text "3.0" at 3125,2225 h80
  text "2.4" at 3575,2225 h80
  text "GND" at 2670,2215 h80
  text "3.1" at 425,1925 h80
  text "8.7~" at 875,1925 h80
  text "8.3" at 1325,1925 h80
  text "7.3" at 1775,1925 h80
  text "5.5" at 2225,1925 h80
  text "4.5" at 2675,1925 h80
  text "4.1" at 3125,1925 h80
  text "3.5" at 3575,1925 h80
  text "3.2" at 425,1825 h80
  text "9.0" at 875,1825 h80
  text "8.4" at 1325,1825 h80
  text "8.0" at 1775,1825 h80
  text "5.6" at 2225,1825 h80
  text "4.6" at 2675,1825 h80
  text "4.2" at 3125,1825 h80
  text "3.6" at 3575,1825 h80
  text "3.3" at 425,1725 h80
  text "9.1~" at 875,1725 h80
  text "8.5" at 1325,1725 h80
  text "8.1" at 1775,1725 h80
  text "5.7" at 2225,1725 h80
  text "4.7" at 2675,1725 h80
  text "4.7" at 2675,1725 h80
  text "4.3" at 3125,1725 h80
  text "3.7" at 3575,1725 h80
  text "3.4" at 425,1625 h80
  text "9.2" at 875,1625 h80
  text "8.6" at 1325,1625 h80
  text "8.2" at 1775,1625 h80
  text "7.2" at 2225,1625 h80
  text "5.4" at 2675,1625 h80
  text "4.4" at 3125,1625 h80
  text "4.0" at 3575,1625 h80
  text "SW8" at 4725,1625 h80
  text "1.5" at 4925,1625 h80
  text "11.2" at 5250,1625 h80
  text "SW6" at 4725,1525 h80
  text "1.6" at 4925,1525 h80
  text "11.0" at 5250,1525 h80
  text "SW4" at 4725,1425 h80
  text "1.7" at 4925,1425 h80
  text "10.6" at 5250,1425 h80
  text "9.3~" at 425,1325 h80
  text "9.7~" at 875,1325 h80
  text "SW2" at 4725,1325 h80
  text "2.0" at 4925,1325 h80
  text "10.4" at 5250,1325 h80
  text "9.4" at 425,1225 h80
  text "10.0~" at 875,1225 h80
  text "SW3" at 4725,1225 h80
  text "2.4" at 4925,1225 h80
  text "10.5" at 5250,1225 h80
  text "9.5" at 425,1125 h80
  text "10.1~" at 875,1125 h80
  text "SW1" at 4725,1125 h80
  text "2.7" at 4925,1125 h80
  text "10.3" at 5250,1125 h80
  text "9.6~" at 425,1025 h80
  text "10.2~" at 875,1025 h80
  text "2.7" at 3400,640 h80
  text "2.0" at 3700,640 h80
  text "2.4" at 4000,640 h80
  text "1.7" at 4300,640 h80
  text "1.6" at 4900,640 h80
  text "1.5" at 5500,640 h80
  text "10.2 10.1" at 440,620 h60
  text "10.3" at 3360,570 h80
  text "10.4" at 3660,570 h80
  text "10.5" at 3960,570 h80
  text "10.6" at 4260,570 h80
  text "10.7" at 4560,570 h80
  text "11.0" at 4860,570 h80
  text "11.1" at 5160,570 h80
  text "11.2" at 5460,570 h80
  text "GND VCC SCL SDA" at 680,520 h60
  text "-12V" at 2525,425 h60 r90
  text "GND" at 2625,425 h60 r90
  text "+5V" at 2725,425 h60 r90
  text "+12V" at 2825,425 h60 r90
  text "POW  3V3" at 1620,400 h60
  text "8.7" at 1920,400 h60
  text "BL 3V3" at 2020,400 h60
  text "VCC GND SCL SDA" at 680,380 h60
  text "10.0 9.7 9.6  9.1  9.3" at 1150,260 h60
  text "POW  3V3" at 420,140 h60
  text "RST CE DC Din CLK Vcc BL GND" at 1180,80 h60
Bottom Overlay:
  text "Expansion_Board_2021.6.12" at 4635,80 h80
Top Solder:
  lines w100: 600,3900 1100,3900 ; 1500,3900 2000,3900 ; 2400,3900 2900,3900 ; 3300,3900 3800,3900 ; 450,3075.59 ccw(c450,3075.59) 450,3075.59
Bottom Solder:
  lines w100: 600,3900 1100,3900 ; 1500,3900 2000,3900 ; 2400,3900 2900,3900 ; 3300,3900 3800,3900
Mechanical 13:
  lines w20: 5900,0 ccw(c5900,100) 6000,100 ; 5900,0 5900,0 ; 5900,0 4500,0 1500,0 100,0 cw(c100,100) 0,100 0,3900 cw(c100,3900) 100,4000 5900,4000 ; 5900,4000 cw(c5900,3900) 6000,3900 6000,100 ; 5900,4000 5900,4000 ; 6000,100 6000,100

## Text inside footprints (layer, text, board x,y; h text height)
J1: Top Overlay "2" at 342,3650 h40; Top Overlay "1" at 350,3557 h40
J4: Top Overlay "9" at 3925,3550 h40; Top Overlay "10" at 3925,3650 h40
P1: Bottom Overlay "2" at 5635,2530 h50; Bottom Overlay "1" at 5635,2430 h50; Bottom Overlay "26" at 4275,2530 h50
P2: Bottom Overlay "2" at 4155,2450 h50 r90; Bottom Overlay "1" at 4255,2450 h50 r90; Bottom Overlay "26" at 4155,1090 h50 r90
P3: Bottom Overlay "2" at 4235,970 h50 r180; Bottom Overlay "1" at 4235,1070 h50 r180; Bottom Overlay "26" at 5595,970 h50 r180
P4: Bottom Overlay "2" at 5715,1050 h50 r270; Bottom Overlay "1" at 5615,1050 h50 r270; Bottom Overlay "26" at 5715,2410 h50 r270